# Altium PCB HatBoard.PcbDoc
Units mm, origin at the board's own origin, x right, y up, seen from the top; angles counter-clockwise.
Board outline 65 x 56 mm, 2 copper layers (Top Layer, Bottom Layer); 13 components, 18 nets, 82 pads, 0 vias.
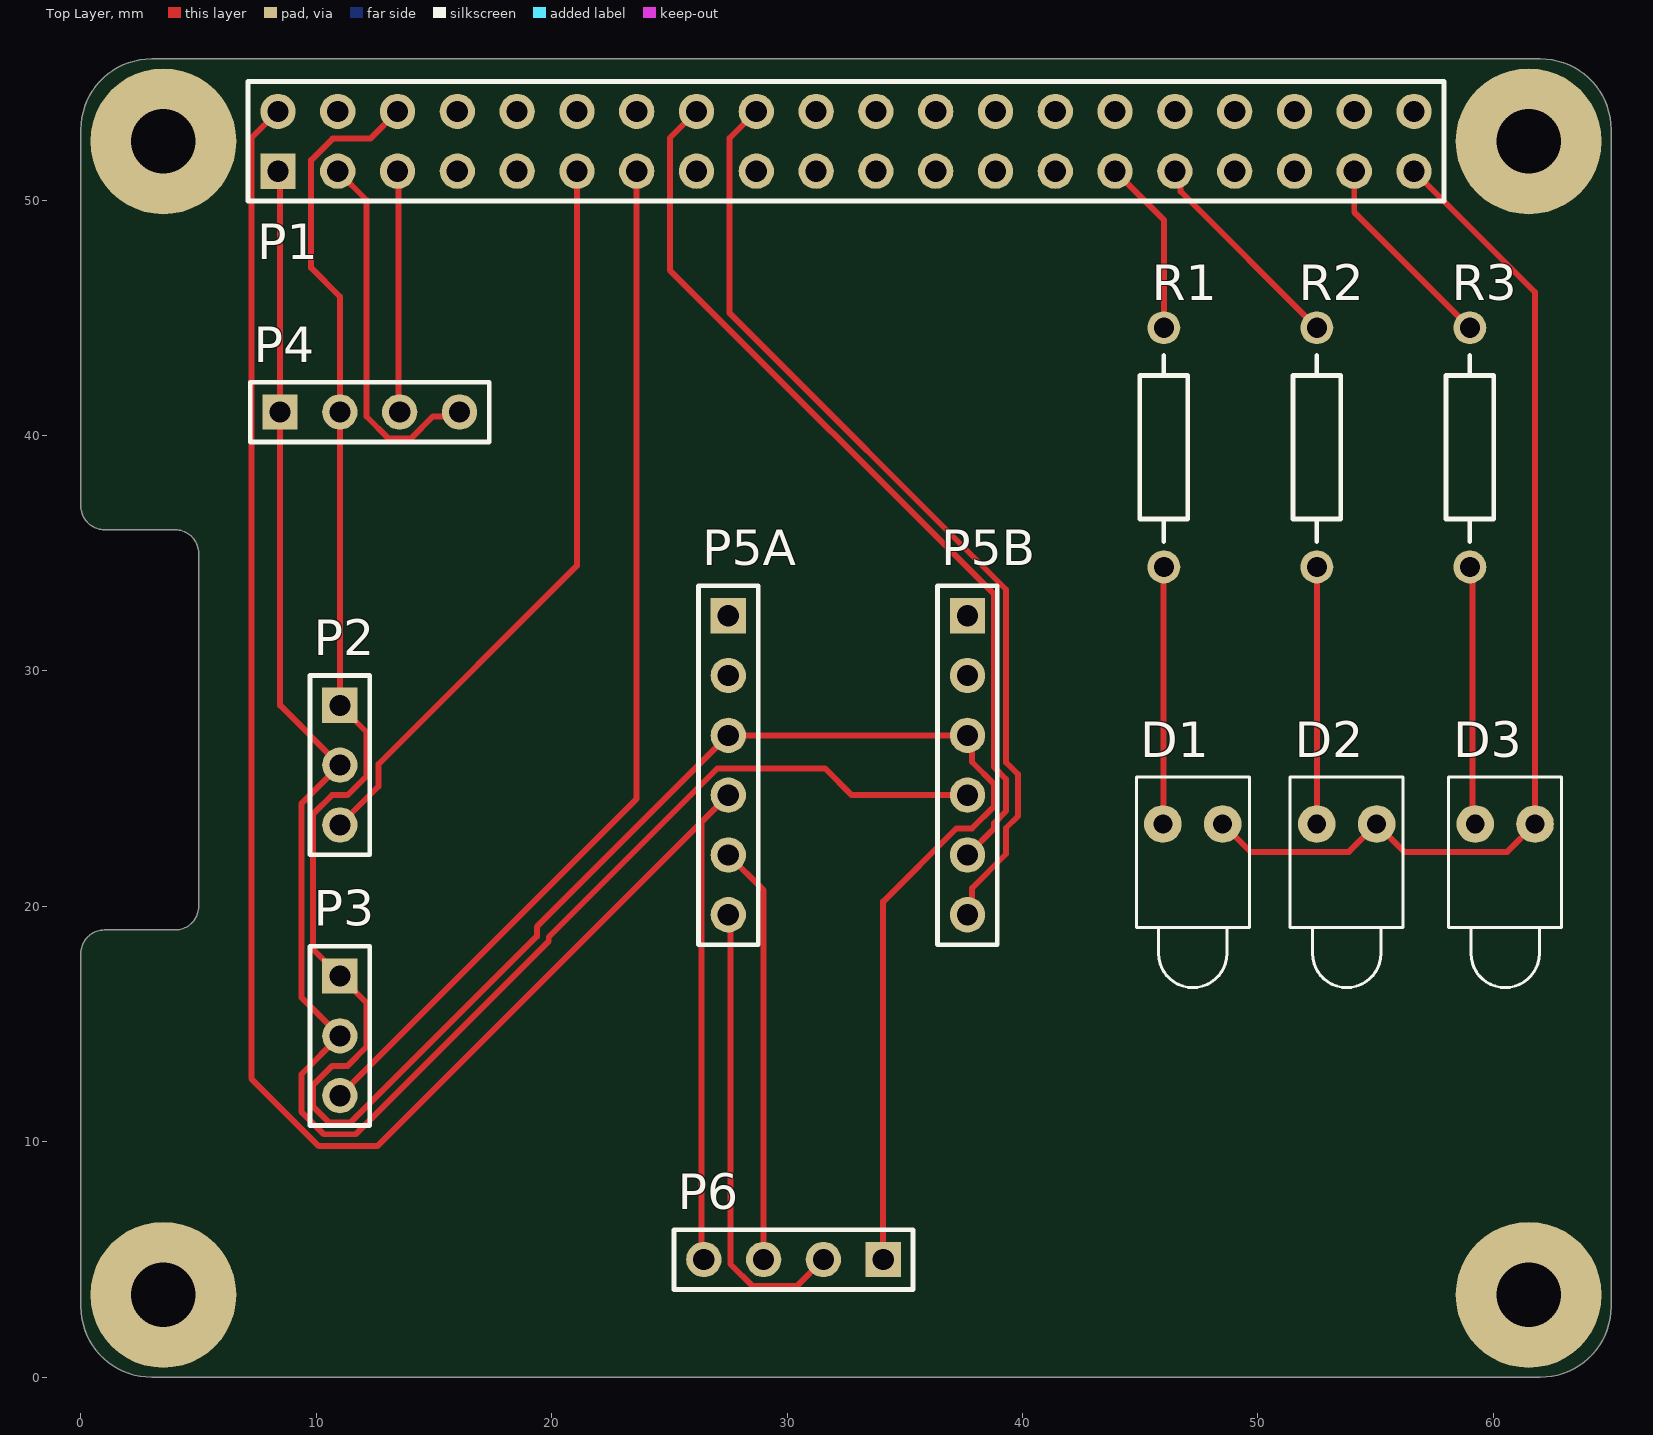
[diagram p0: Top Layer view]
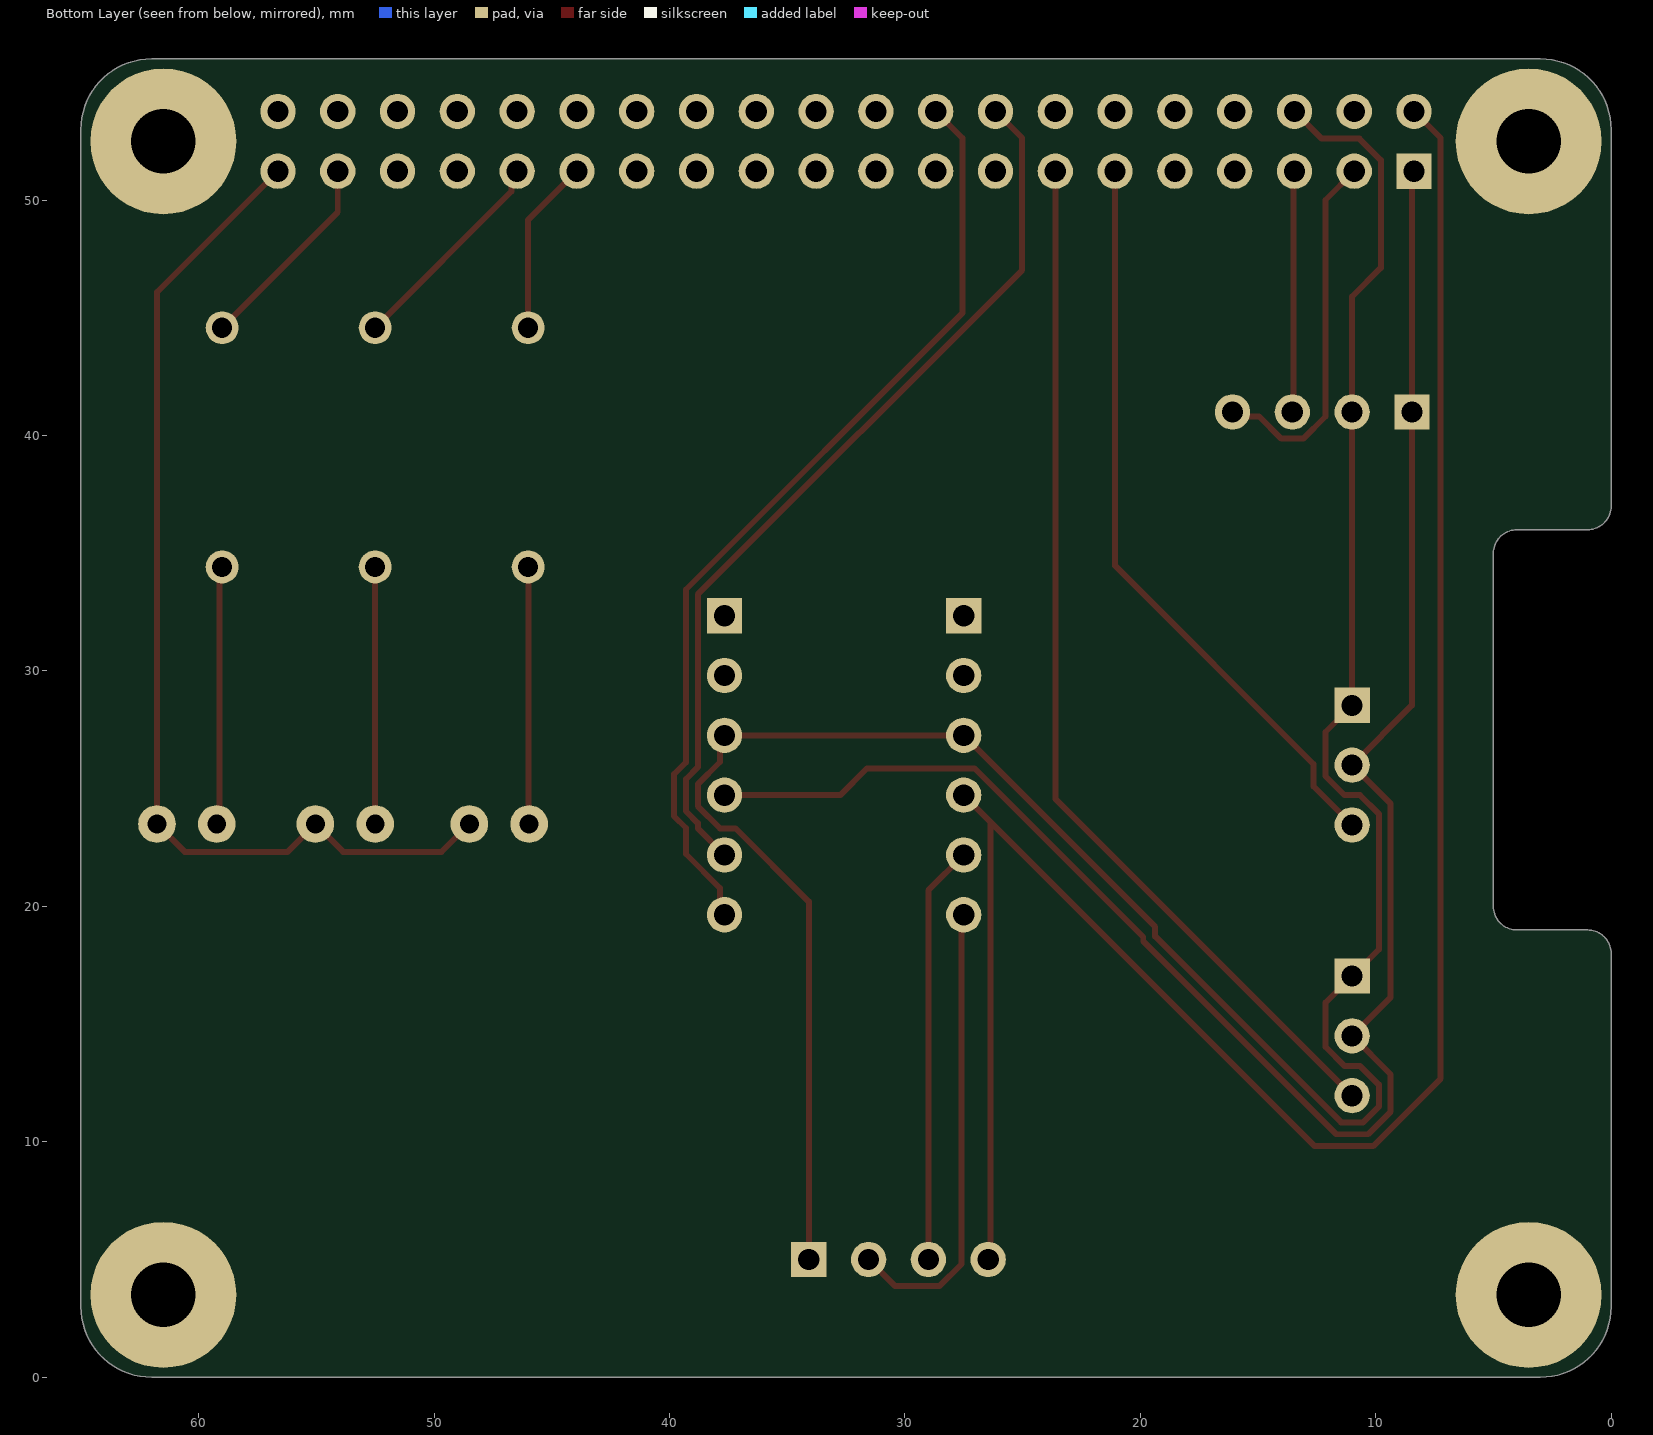
[diagram p1: Bottom Layer view, seen from below]

## Layer stack, top to bottom
Top Solder: solder mask 0.0102, Solder Resist, Dk 3.5
Top Layer: signal copper 0.0356
Dielectric 1: dielectric 0.32, FR-4, Dk 4.8
Bottom Layer: signal copper 0.0356
Bottom Solder: solder mask 0.0102, Solder Resist, Dk 3.5

## Board outline
0,3 0,18 cw(c1,18) 1,19 4,19 ccw(c4,20) 5,20 5,35 ccw(c4,35) 4,36 1,36 cw(c1,37) 0,37 0,53 cw(c3,53) 3,56 62,56 cw(c62,53) 65,53 65,3 cw(c62,3) 62,0 3,0 cw(c3,3)

## Design rules (kind name [scope] priority, off if disabled: settings)
Clearance [All] p1: gap=0.254 ignorepadtopadclearanceinfootprint=FALSE
HoleSize [All] p1: absolutevalues=TRUE maxlimit=2.794 minlimit=0.025 maxpercent=80.000 minpercent=20.000
PolygonConnect [All] p1: connectstyle=Relief reliefconductorwidth=0.254 reliefentries=4 polygonreliefangle="90 Angle" airgapwidth=0.254
RoutingVias [All] p1: holewidth=0.711 width=1.27 viastyle="Through Hole" minholewidth=0.711 minwidth=1.27 maxholewidth=0.711 maxwidth=1.27
SolderMaskExpansion [All] p1: expansion=0.102 istentingtop=FALSE
Width [All] p1: maxlimit=0.254 minlimit=0.254 preferedwidth=0.254
29 further rules are at their usual default settings.

## Components (designator, comment, footprint, x,y, rotation, side; value= is the part's Value field where it differs from the comment)
D1 "LED1" LED-1 47.23,23.5 r270 top
D2 "LED1" LED-1 53.77,23.5 r270 top
D3 "LED1" LED-1 60.5,23.5 r270 top
P1 "Raspberry Pi 5" HDR2X20 8.37,51.23 r0 top
P2 "KY-004" HDR1X3 11,28.54 r270 top
P3 "KY-004" HDR1X3 11,17.04 r270 top
P4 "SHT31" HDR1X4 8.46,41 r0 top
P5A "Header 6" HDR1X6 27.5,32.345 r270 top
P5B "Header 6" HDR1X6 37.66,32.345 r270 top
P6 "HC-SR04" HDR1X4 34.08,5 r180 top
R1 "Res1" AXIAL-0.4 46,39.5 r270 top value=0.1K
R2 "Res1" AXIAL-0.4 52.5,39.5 r270 top value=0.1K
R3 "Res1" AXIAL-0.4 59,39.5 r270 top value=0.1K

## Footprints (in the part's own frame and the unit in brackets; to place one, negate y for a bottom-side part, rotate by r counter-clockwise, add the part's x,y. Pads: shape width x height; smd on the part's side, far side on the other; paste and mask are expansions set on the pad)
AXIAL-0.4 [mm] "Axial Device, Thru-Hole; 2 Leads; 0.4 in Pin Spacing"
  round 1.4 hole 0.85: 1(-5.08,0) 2(5.08,0)
  silkscreen extent -3.9,-1.02 4,1.02
HDR1X3 [mm] "Connector; Header; 3 Position"
  rect 1.5x1.5 hole 0.9: 1(0,0)
  round 1.5 hole 0.9: 2(2.54,0) 3(5.08,0)
  silkscreen extent -1.27,-1.27 6.35,1.27
HDR1X4 [mm] "Connector; Header; 4 Position"
  rect 1.5x1.5 hole 0.9: 1(0,0)
  round 1.5 hole 0.9: 2(2.54,0) 3(5.08,0) 4(7.62,0)
  silkscreen extent -1.27,-1.27 8.89,1.27
HDR1X6 [mm] "Connector; Header; 6 Position"
  rect 1.5x1.5 hole 0.9: 1(0,0)
  round 1.5 hole 0.9: 2(2.54,0) 3(5.08,0) 4(7.62,0) 5(10.16,0) 6(12.7,0)
  silkscreen extent -1.27,-1.27 13.97,1.27
HDR2X20 [mm] "Connector; Header; 20x2 Position"
  rect 1.5x1.5 hole 0.9: 1(0,0)
  round 1.5 hole 0.9: 2(0,2.54) 3(2.54,0) 4(2.54,2.54) 5(5.08,0) 6(5.08,2.54) 7(7.62,0) 8(7.62,2.54) 9(10.16,0) 10(10.16,2.54) 11(12.7,0) 12(12.7,2.54) 13(15.24,0) 14(15.24,2.54) 15(17.78,0) 16(17.78,2.54) 17(20.32,0) 18(20.32,2.54) 19(22.86,0) 20(22.86,2.54) 21(25.4,0) 22(25.4,2.54) 23(27.94,0) 24(27.94,2.54) 25(30.48,0) 26(30.48,2.54) 27(33.02,0) 28(33.02,2.54) 29(35.56,0) 30(35.56,2.54) 31(38.1,0) 32(38.1,2.54) 33(40.64,0) 34(40.64,2.54) 35(43.18,0) 36(43.18,2.54) 37(45.72,0) 38(45.72,2.54) 39(48.26,0) 40(48.26,2.54)
  silkscreen extent -1.27,-1.27 49.53,3.81
LED-1 [mm] "LED; 2 Leads"
  round 1.6 hole 0.8: 1(0,1.27) 2(0,-1.27)
  silkscreen extent -2,-2.4 6.95,2.4

## Part data
D1 D2 D3: "Typical RED GaAs LED", LatestRevisionDate=08-Jul-2005, LatestRevisionNote="Mech Layer 1 removed.", PackageDescription="LED; 2 Leads", PackageReference=LED-1, Published=8-Jun-2000, Publisher="Altium Limited"
P1: library part "Header 20X2", "Header, 20-Pin, Dual row", LatestRevisionDate=17-Jul-2002, LatestRevisionNote="Re-released for DXP Platform.", Publisher="Altium Limited"
P2 P3: library part "Header 3", "Header, 3-Pin", LatestRevisionDate=17-Jul-2002, LatestRevisionNote="Re-released for DXP Platform.", Publisher="Altium Limited"
P4 P6: library part "Header 4", "Header, 4-Pin", LatestRevisionDate=17-Jul-2002, LatestRevisionNote="Re-released for DXP Platform.", Publisher="Altium Limited"
P5A P5B: "Header, 6-Pin", LatestRevisionDate=17-Jul-2002, LatestRevisionNote="Re-released for DXP Platform.", Publisher="Altium Limited"
R1 R2 R3: "Resistor", LatestRevisionDate=17-Jul-2002, LatestRevisionNote="Re-released for DXP Platform.", PackageDescription="Axial Device, Thru-Hole; 2 Leads; 0.3 in Pin Spacing", PackageReference=AXIAL-0.3, Published=8-Jun-2000, Publisher="Altium Limited"

## Free pads (board coordinates)
  round 6.2 hole 2.75 unplated: 0(3.5,3.5) 0(3.5,52.5) 0(61.5,3.5) 0(61.5,52.5)

## Nets (pads, with @x,y where several pads share a name; then routed paths per layer and width w, separated by ;. In a path a pad name is that pad's centre, name@x,y a point inside that pad or via, vN(x,y) a via of type N, cw(c..) or ccw(c..) an arc to the next point about the centre after c; other vN are vias at no path point)
3.3V: P1.1 P2.2 P3.2 P4.1 P5B.4 | length 78.8
  Top Layer w0.254: P1.1 8.46,51.14 P4.1 8.46,28.54 P2.2 9.361,24.361 9.361,16.139 P3.2 9.361,12.861 9.361,11.281 10.321,10.321 11.679,10.321 19.873,18.515 19.873,18.698 27.032,25.856 31.612,25.856 32.743,24.725 P5B.4
5V: P1.2 P5A.4 P6.4 | length 87.8
  Top Layer w0.254: P1.2 7.239,52.639 7.239,12.685 10.111,9.813 12.588,9.813 26.369,23.594 ; P6.4 26.369,5.091 26.369,23.594 ; P5A.4 26.369,23.594
Echo: P5A.6 P6.2 | length 19.7
  Top Layer w0.254: P5A.6 27.591,19.554 27.591,4.81 28.532,3.869 30.409,3.869 P6.2
GND: P1.6 P2.1 P3.1 P4.2 P5A.3 P5B.3 P6.1 | length 109.5
  Top Layer w0.254: P1.6 12.295,52.615 10.696,52.615 9.779,51.698 9.779,47.128 11,45.907 P4.2 P2.1 12.131,27.409 12.131,25.532 11.329,24.73 10.671,24.73 9.869,23.928 9.869,18.171 12.131,15.909 12.131,14.032 11.329,13.23 10.671,13.23 9.869,12.428 9.869,11.492 10.532,10.829 11.468,10.829 19.365,18.726 19.365,19.13 P5A.3 P5B.3 37.85,27.075 37.85,26.134 38.791,25.194 38.791,24.257 37.85,23.316 37.192,23.316 34.08,20.205 P6.1
"GPIO 2": P1.3 P4.4 | length 15.7
  Top Layer w0.254: P1.3 12.131,50.009 12.131,40.81 13.072,39.869 14.008,39.869 14.949,40.81 15.89,40.81 P4.4
"GPIO 3": P1.5 P4.3 | length 10.3
  Top Layer w0.254: P1.5 13.495,51.185 13.495,41.045 P4.3
"GPIO 05": P1.29 R1.1 | length 7.5
  Top Layer w0.254: P1.29 46,49.16 R1.1
"GPIO 06": P1.31 R2.1 | length 9.1
  Top Layer w0.254: P1.31 46.708,50.992 46.708,50.372 R2.1
"GPIO 17": P1.11 P2.3 | length 31.9
  Top Layer w0.254: P2.3 12.639,25.099 12.639,26.04 21.07,34.471 P1.11
"GPIO 23": P1.16 P5B.5 | length 38.6
  Top Layer w0.254: P1.16 25.019,52.639 25.019,47.025 38.791,33.253 38.791,25.912 39.299,25.404 39.299,24.046 38.791,23.538 38.791,23.316 P5B.5
"GPIO 24": P1.18 P5B.6 | length 40.6
  Top Layer w0.254: P1.18 27.559,52.639 27.559,45.203 39.299,33.463 39.299,26.122 39.807,25.614 39.807,23.836 39.299,23.328 39.299,22.225 37.85,20.776 37.85,19.836 P5B.6
"GPIO 26": P1.37 R3.1 | length 8.7
  Top Layer w0.254: P1.37 54.09,49.49 R3.1
"GPIO 27": P1.13 P3.3 | length 44.5
  Top Layer w0.254: P3.3 23.61,24.57 P1.13
NetD1_1: D1.1 D2.1 D3.1 P1.39 | length 45.1
  Top Layer w0.254: D1.1 49.681,22.319 53.859,22.319 D2.1 56.221,22.319 60.589,22.319 D3.1 61.77,46.09 P1.39
NetD1_2: D1.2 R1.2 | length 10.9
  Top Layer w0.254: D1.2 45.98,23.52 45.98,34.4 R1.2
NetD2_2: D2.2 R2.2 | length 10.9
  Top Layer w0.254: D2.2 R2.2
NetD3_2: D3.2 R3.2 | length 11
  Top Layer w0.254: R3.2 59.115,34.305 59.115,23.615 D3.2
Trig: P5A.5 P6.3 | length 17.8
  Top Layer w0.254: P5A.5 29,20.685 P6.3
pads on no net: P1.4 P1.7 P1.8 P1.9 P1.10 P1.12 P1.14 P1.15 P1.17 P1.19 P1.20 P1.21 P1.22 P1.23 P1.24 P1.25 P1.26 P1.27 P1.28 P1.30 P1.32 P1.33 P1.34 P1.35 P1.36 P1.38 P1.40 P5A.1 P5A.2 P5B.1 P5B.2

## Silkscreen, mask and mechanical layers (free items; w line width, h text height)
Mechanical 1:
  lines w0.127: 0,3 ccw(c3,3) 3,0 ; 0,18 cw(c1,18) 1,19 ; 0,37 ccw(c1,37) 1,36 ; 0,53 cw(c3,53) 3,56 ; 4,19 ccw(c4,20) 5,20 ; 4,36 cw(c4,35) 5,35 ; 62,0 ccw(c62,3) 65,3 ; 62,56 cw(c62,53) 65,53
Docu:
  text "Connector alligment / Center 40p connector" at 27.5,48.5 h0.58
  text "Connector alligment / Pin1" at 8,46.5 h0.58

## Dimensions
5,35 to 0,30 on Docu
3,0 to 3.5,3.5 on Docu
4,36 to 3,56 on Docu
0,3 to 3.5,3.5 on Docu
4,36 to 4,19 on Docu
0,18 to 45,4 on Docu
0,53 to 65,53 on Docu
62,56 to 62,0 on Docu
3,53 to 1,64 on Docu
1,18 to 1,18 on Docu